# Altium PCB PCB_Cyborg_greenC_LED_UV.PcbDoc
Units mm, origin at the board's own origin, x right, y up, seen from the top; angles counter-clockwise.
Board outline 16.5 x 7 mm, 2 copper layers (Top Layer, Bottom Layer); 11 components, 10 nets, 30 pads, 17 vias.
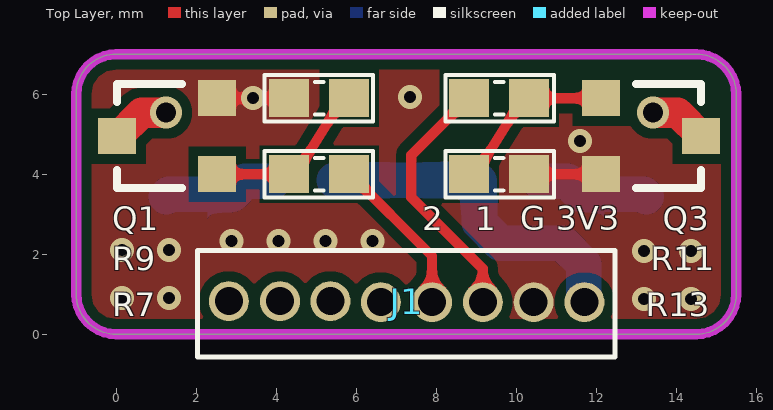
[diagram p0: Top Layer view]
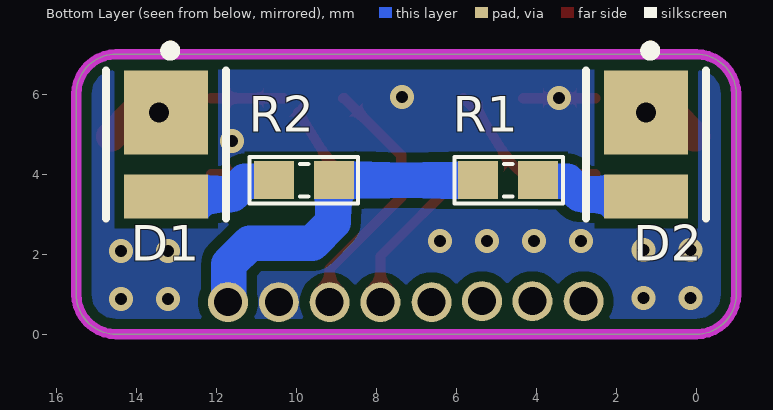
[diagram p1: Bottom Layer view, seen from below]
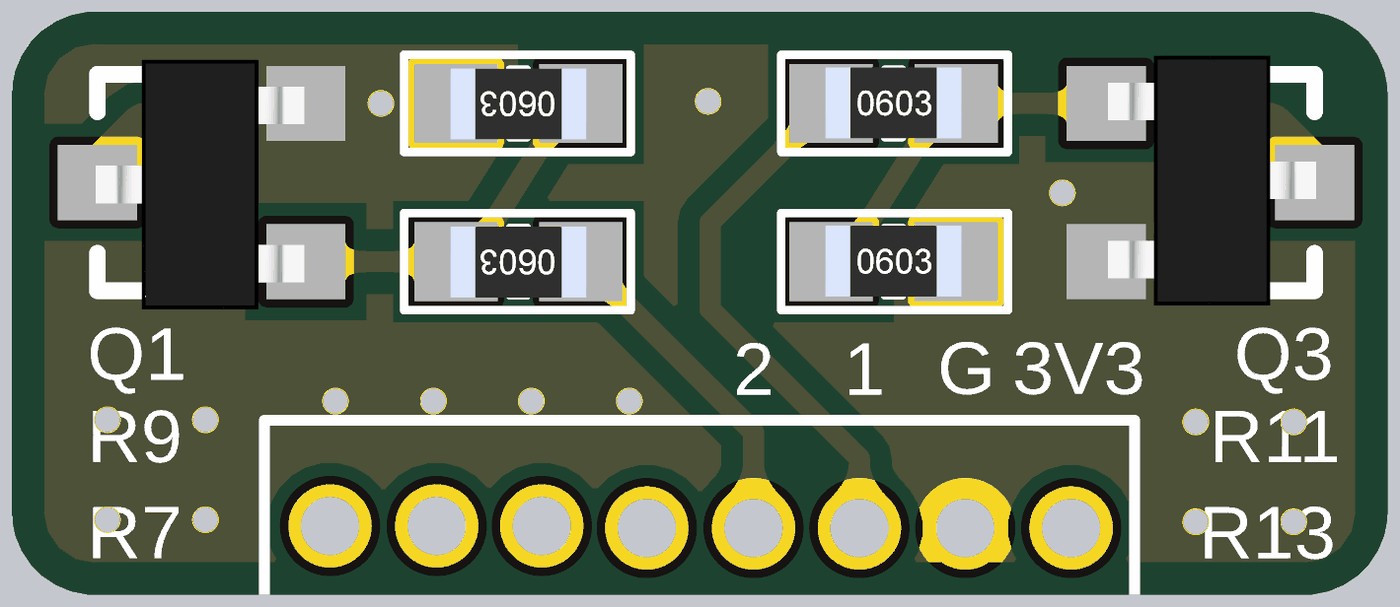
[diagram p2: 3D render of the assembled board from above, using the file's embedded part models]
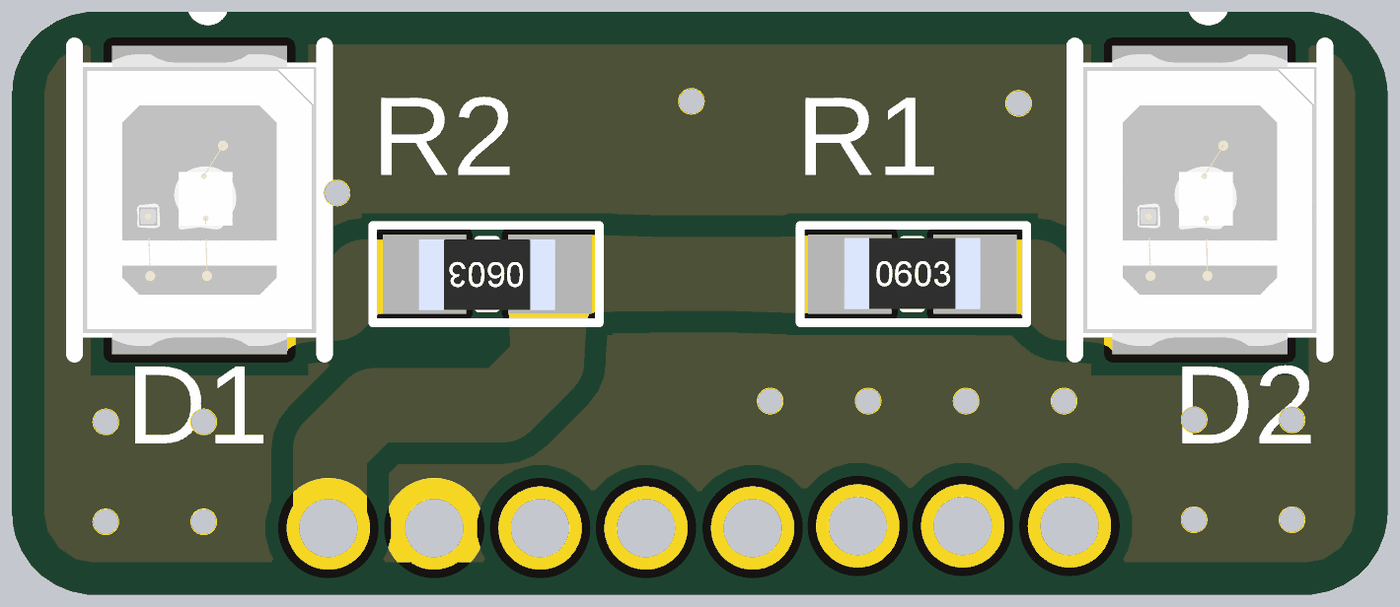
[diagram p3: 3D render of the assembled board from below, using the file's embedded part models]

## Layer stack, top to bottom
Top Solder: solder mask 0.0102, Solder Resist, Dk 3.5
Top Layer: signal copper 0.0356
Dielectric 1: dielectric 0.32, FR-4, Dk 4.8
Bottom Layer: signal copper 0.0356
Bottom Solder: solder mask 0.0102, Solder Resist, Dk 3.5

## Board outline
-1,1 -1,6 cw(c0,6) 0,7 14.5,7 cw(c14.5,6) 15.5,6 15.5,1 cw(c14.5,1) 14.5,0 0,0 cw(c0,1)

## Design rules (kind name [scope] priority, off if disabled: settings)
Clearance [All] p1: gap=0.254 ignorepadtopadclearanceinfootprint=FALSE
PolygonConnect [All] p1: connectstyle=Direct reliefconductorwidth=0.254 reliefentries=4 polygonreliefangle="90 Angle" airgapwidth=0.254
RoutingVias [All] p1: holewidth=0.3 width=0.6 viastyle="Through Hole" minholewidth=0.3 minwidth=0.6 maxholewidth=0.5 maxwidth=1.1
SolderMaskExpansion [All] p1: expansion=0.102 istentingtop=FALSE
Width [All] p1: maxlimit=2 minlimit=0.254 preferedwidth=1
30 further rules are at their usual default settings.

## Classes and differential pairs
component class SCH_Cyborg_greenC_LED_UV: D2 J1 Q1 Q3 R1 R2 R7 R9 R11 R13

## Components (designator, comment, footprint, x,y, rotation, side; value= is the part's Value field where it differs from the comment)
D1 "Ultraviolet, 3.6V, 120°" WL-SUTW_2835 13.25,4.739 r270 bottom
D2 "Ultraviolet, 3.6V, 120°" WL-SUTW_2835 1.25,4.739 r270 bottom
J1 "JP1x8" "JP1X8 1.27mm" 7.26,0.851 r180 top
Q1 "AO3400" SOT23-132 1.275,4.95 r90 top
Q3 "AO3400" SOT23-132 13.375,4.95 r270 top
R1 "10R" "tro smd 0603" 4.7,3.85 r180 bottom
R2 "10R" "tro smd 0603" 9.801,3.85 r0 bottom
R7 "100R" "tro smd 0603" 5.075,4 r180 top
R9 "10K" "tro smd 0603" 5.075,5.9 r180 top
R11 "100R" "tro smd 0603" 9.575,5.9 r0 top
R13 "10K" "tro smd 0603" 9.575,4 r0 top

## Footprints (in the part's own frame and the unit in brackets; to place one, negate y for a bottom-side part, rotate by r counter-clockwise, add the part's x,y. Pads: shape width x height; smd on the part's side, far side on the other; paste and mask are expansions set on the pad)
"JP1X8 1.27mm" [mm] "1.27MM"
  round 1 hole 0.7: 1(-4.445,0.051) 2(-3.175,0.051) 3(-1.905,0.051) 4(-0.635,0.051) 5(0.645,0.051) 6(1.905,0.026) 7(3.165,0.026) 8(4.445,0.026)
  silkscreen extent -5.21,-1.24 5.23,1.42
SOT23-132 [mm]
  rect 0.9x0.95 smd: 1(-0.95,-1.25) 3(0,1.25)
  rect 0.9x0.95 smd mask+0: 2(0.95,-1.25)
  silkscreen extent -1.3,-0.38 1.3,1.25, body extent -1.52,-1.23 1.48,1.27, height 1.06
"tro smd 0603" [mm] "Chip Capacitor, 2-Leads, Body 1,60x0,80mm, IPC Medium Density"
  rect 1x0.95 smd mask+0.076: 1(-0.75,0) 2(0.75,0)
  silkscreen extent -1.35,-0.58 1.37,0.58, body extent -0.82,-0.42 0.82,0.43, height 0.44
WL-SUTW_2835 [mm] "SMT Ultraviolet TopLED Waterclear, body 3.50 x 2.80 mm"
  rect 2.1x2.1 smd: 1(-0.8,0)
  rect 1.1x2.1 smd: 2(1.3,0)
  silkscreen extent -2.47,-1.5 1.85,1.5, body extent -1.75,-1.4 1.75,1.4, height 0.7

## Part data
D1 D2: library part 153283367A212, "WL-SUTW SMT Ultraviolet Top LED Waterclear, size 2835, Ultraviolet, 3.6V, 120°", Case/Size Code=2835, Emitting Color=Ultraviolet, Forward Voltage=3.6V, Manufacturer="Wurth Elektronik", Operating Temperature Max=85°C, Operating Temperature Min=-40°C, Category=Ultraviolet, Chip Technology=AlInGaN, ComponentLink1Description="Website Link", ComponentLink1URL=https://www.we-online.com/redexpert/article/153283367A212?ad, ComponentLink2Description="Datasheet Link", ComponentLink2URL=https://www.we-online.com/redexpert/spec/153283367A212?ad, Height=0.7mm, Length=3.5mm, Manufacturer Part Number=153283367A212, Match Code=WL-SUTW, Mount="Surface Mount", Packaging="Tape and Reel", Peak Wavelength=365nm, Radiant Flux=50mW, Radiant Flux Min=30mW, Viewing Angle=120°, Width=2.8mm
J1: "1.27mm"
Q1 Q3: library part Si2302DS, "N-Channel MOSFET", LatestRevisionDate=17-Jul-2002, LatestRevisionNote="Re-released for DXP Platform.", PackageDescription="TO, Flat Index; 3 In-Line, Axial Leads; Body Dia. 4.6mm; Lead Dia. 0.5 mm (max)", PackageReference=E3, PackageVersion=1995/1996, Published=8-Jun-2000, Publisher="Altium Limited"
R1 R2 R7 R9 R11 R13: library part "Tro 0603 5% 1k", "Dán", Chung_Loai=Dán, Don_Vi=Con, Ma_Hang=MH006319, So_Chan=2, Ten_Linh_Kien="Trở 0603 5% 1k"

## Via types
v1: diameter 0.6, hole 0.3, Top Layer to Bottom Layer, tented both sides, 15 vias
v2: diameter 0.8, hole 0.5, Top Layer to Bottom Layer, tented both sides, 2 vias

## Nets (pads, with @x,y where several pads share a name; then routed paths per layer and width w, separated by ;. In a path a pad name is that pad's centre, name@x,y a point inside that pad or via, vN(x,y) a via of type N, cw(c..) or ccw(c..) an arc to the next point about the centre after c; other vN are vias at no path point)
+3V3: J1.1 R1.1 R2.1 | length 8.7
  Bottom Layer w0.889: R1.1 R2.1 9.079,3.821 9.079,2.796 9.6,2.275 11.163,2.275 11.684,1.754 11.684,0.821 J1.1
GND: J1.2 Q1.2 Q3.2 R9.2 R13.2 | length 3.6
  Top Layer w0.254: Q1.2 v1(3.425,5.9) R9.2 ; R13.2 Q3.2
  other v1: 13.2,0.875 14.375,0.875 0.145,0.9 1.32,0.9 13.2,2.075 14.375,2.075 0.145,2.1 1.32,2.1 2.88,2.325 4.055,2.325 5.23,2.325 6.405,2.325 11.6,4.825 7.35,5.925
NetD1_1: D1.1 Q3.3 | length 1.4
  Top Layer w0.762: v2@13.432,5.532 14.043,5.532 Q3.3
  other v2: 13.425,5.539
NetD1_2: D1.2 R2.2 | length 2.9
  Bottom Layer w0.889: R2.2 10.581,3.819 11.281,3.819 11.602,3.499 13.191,3.499 D1.2
NetD2_1: D2.1 Q1.3 | length 1.5
  Top Layer w0.762: Q1.3 0.05,4.95 0.632,5.532 1.243,5.532 v2(1.25,5.539)
NetD2_2: D2.2 R1.2 | length 2.9
  Bottom Layer w0.889: D2.2 1.31,3.499 2.899,3.499 3.22,3.819 3.919,3.819 R1.2
NetQ1_1: Q1.1 R7.2 R9.1 | length 4.2
  Top Layer w0.254: Q1.1 R7.2 4.698,4.348 5.452,5.552 R9.1
NetQ3_1: Q3.1 R11.2 R13.1 | length 3.7
  Top Layer w0.254: R13.1 9.198,4.348 R11.2@9.952,5.552 ; R11.2 11.225,5.9 Q3.1
UV1: J1.3 R11.1 | length 6.5
  Top Layer w0.254: R11.1 8.8,5.9 7.375,4.475 7.375,3.425 9.165,1.635 J1.3
UV2: J1.4 R7.1 | length 4.1
  Top Layer w0.254: R7.1 5.85,4 7.895,1.955 J1.4
pads on no net: J1.5 J1.6 J1.7 J1.8

## Polygon pours and split planes (outlines as drawn)
GND on Bottom Layer "GND_L02_P001" (solid, remove dead copper, pour order 1): -0.996,7 15.504,7 15.504,0 -0.996,0
GND on Top Layer "GND_L01_P002" (solid, remove dead copper, pour order 2): -1,7 -1,0 15.5,0 15.5,7

## Keep-outs
Keep-Out Layer:
  the board outline again, w0.254

## Silkscreen, mask and mechanical layers (free items; w line width, h text height)
Top Overlay:
  text "2" at 7.649,2.4 h1.02
  text "1" at 8.975,2.4 h1.02
  text "G" at 10.1,2.411 h1.02
  text "3V3" at 11,2.411 h1.02